# Altium PCB CORE-328PB.PcbDoc
Units mm, origin at the board's own origin, x right, y up, seen from the top; angles counter-clockwise.
Board outline 31.78 x 27.61 mm, 2 copper layers (Top Layer, Bottom Layer); 54 components, 46 nets, 149 pads, 24 vias.
Unrouted connection lines stored in the file: 32.
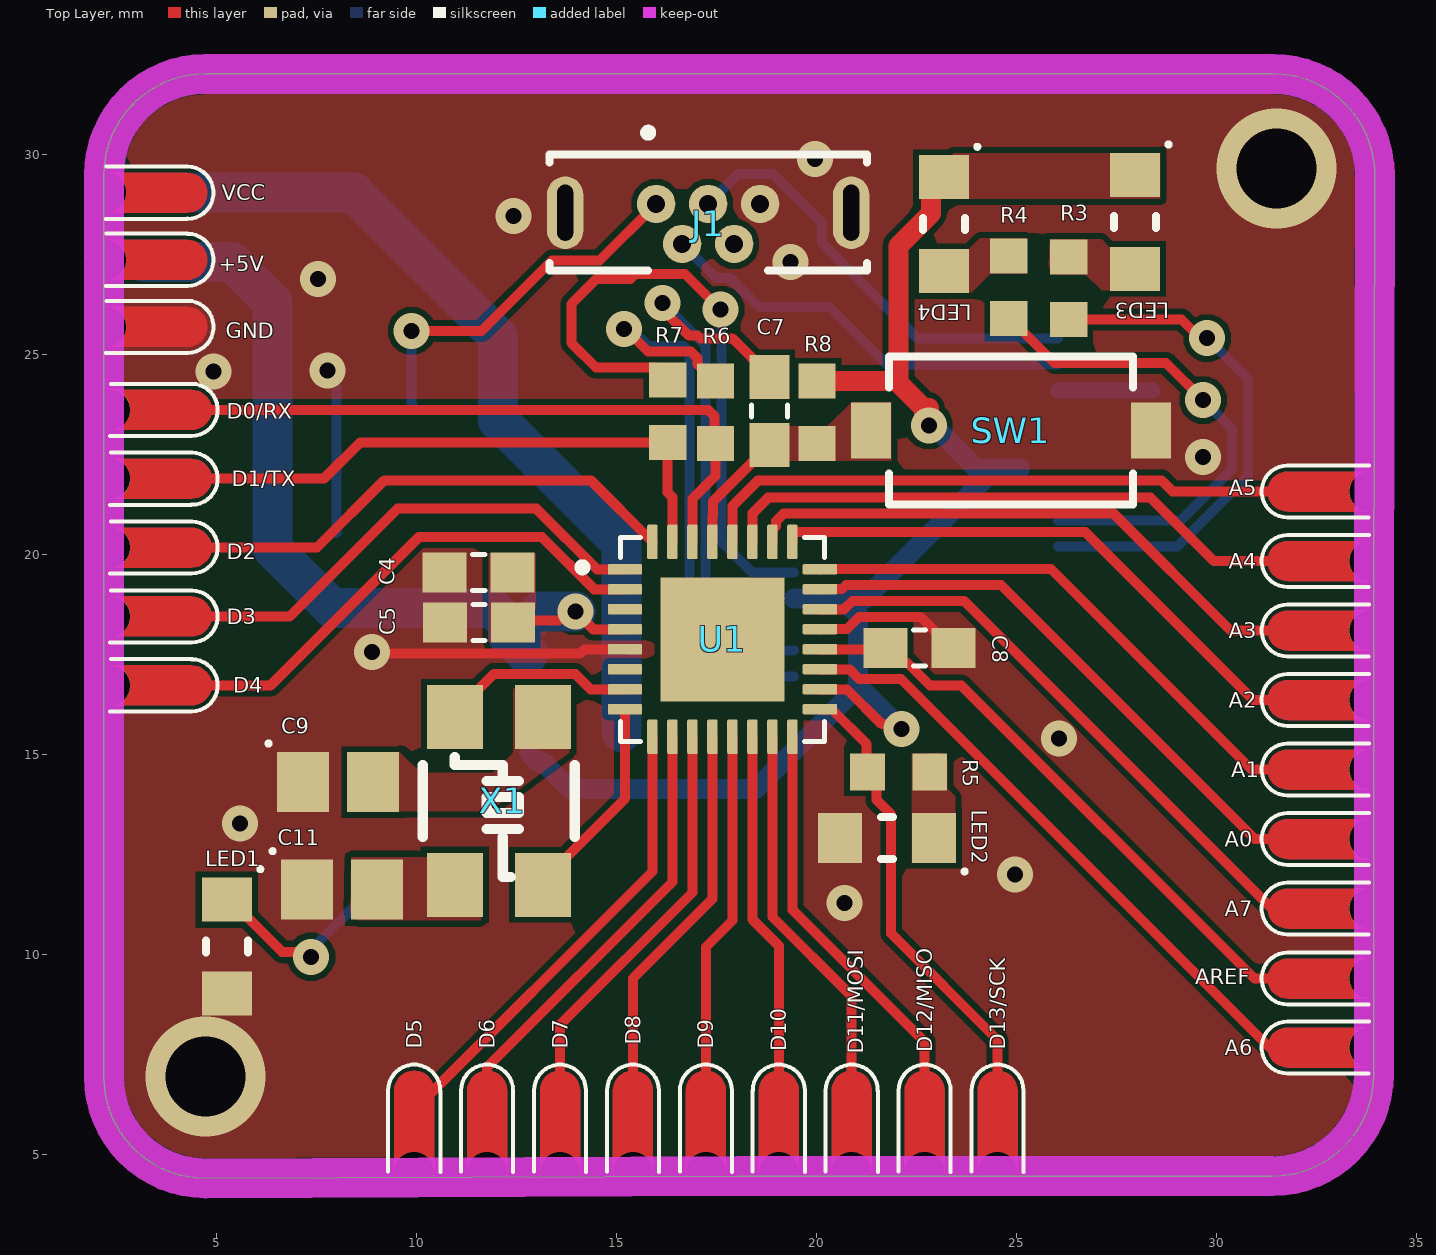
[diagram p0: Top Layer view]
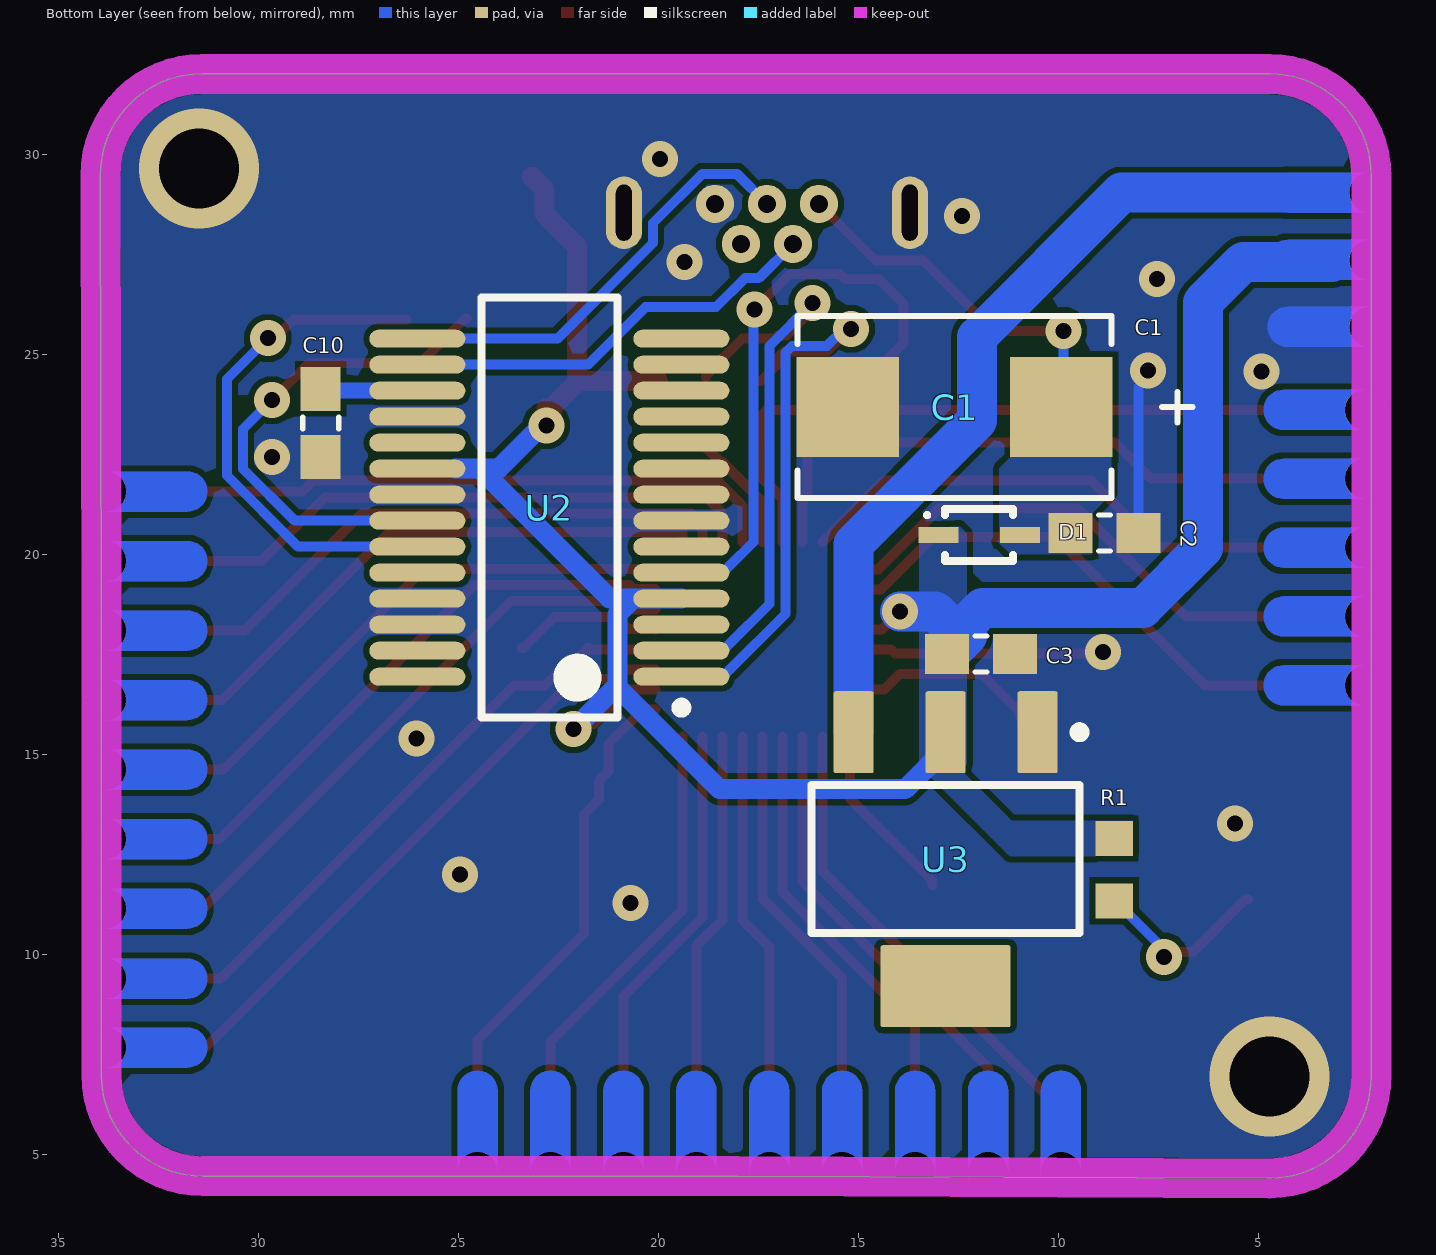
[diagram p1: Bottom Layer view, seen from below]
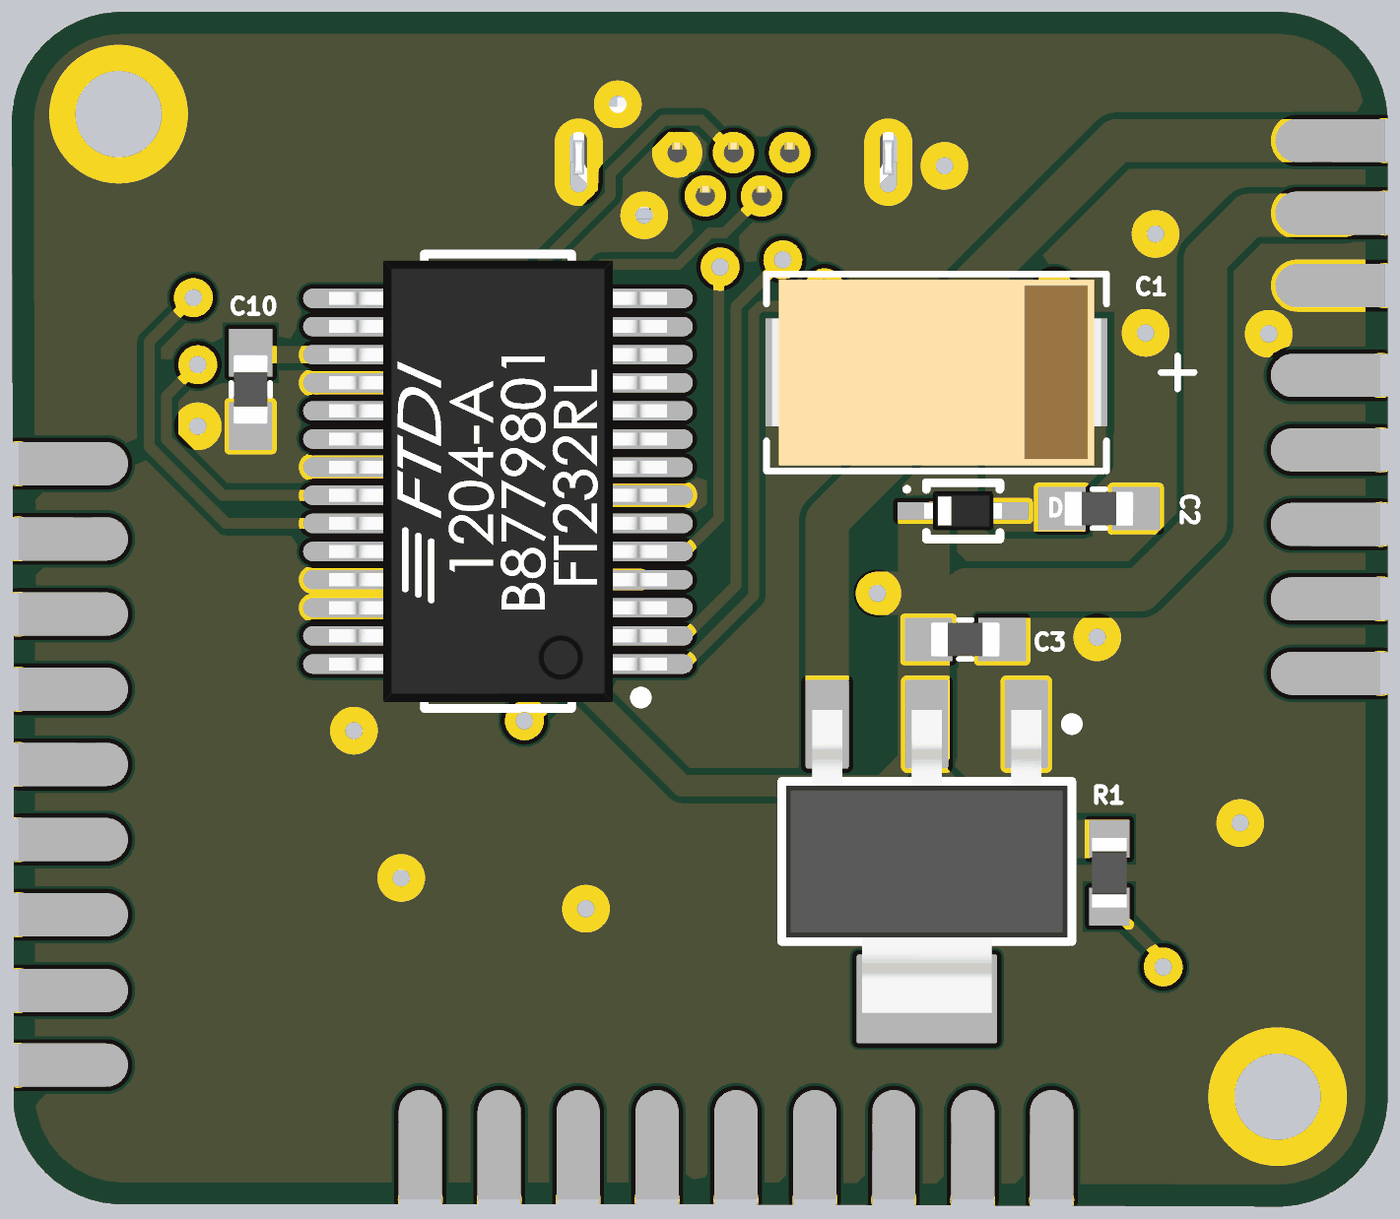
[diagram p2: 3D render of the assembled board from below, using the file's embedded part models]

## Layer stack, top to bottom
Top Solder: solder mask 0.0102, Solder Resist, Dk 3.5
Top Layer: signal copper 0.0356
Dielectric 1: dielectric 0.32, FR-4, Dk 4.8
Bottom Layer: signal copper 0.0356
Bottom Solder: solder mask 0.0102, Solder Resist, Dk 3.5

## Board outline
18.034,4.445 31.394,4.445 ccw(c31.394,6.985) 33.934,6.985 33.934,18.313 33.934,18.339 33.96,29.464 ccw(c31.42,29.464) 31.42,32.004 4.724,32.004 ccw(c4.724,29.464) 2.184,29.464 2.184,18.212 2.184,6.934 ccw(c4.724,6.934) 4.724,4.394

## Design rules (kind name [scope] priority, off if disabled: settings)
AssemblyTestPointUsage [All] p1: isadvanced=TRUE
AssemblyTestpoint [All] p1: isadvanced=TRUE testpointundercomponent=TRUE minsize=1.016 maxsize=2.54 preferedsize=1.524 minholesize=0 maxholesize=1.016 preferedholesize=0.813 testpointgrid=0.025 usegrid=TRUE gridtolerance=0 allowsidetop=TRUE allowsidebottom=TRUE
Clearance Clearance_KeepOut [IsKeepOut] p1: gap=0 ignorepadtopadclearanceinfootprint=FALSE
Clearance Clearance_1 [OnMid vs OnMid] p2: gap=0.15 ignorepadtopadclearanceinfootprint=TRUE sourcerule=44 cellrowname=All cellrowtype=0 cellcolname=All cellcoltype=0 innerlayers=TRUE
Clearance Clearance_2 [(ExistsOnLayer('Top Layer') Or ExistsOnLayer('Bottom Layer')) vs (ExistsOnLayer('Top Layer') Or ExistsOnLayer('Bottom Layer'))] p3: gap=0.15 ignorepadtopadclearanceinfootprint=TRUE sourcerule=44 cellrowname=All cellrowtype=0 cellcolname=All cellcoltype=0 outerlayers=TRUE
Clearance [All] p4: gap=0.254 ignorepadtopadclearanceinfootprint=TRUE ismatrix=TRUE
ComponentClearance [All] p1: isadvanced=TRUE gap=0.254 collisioncheckmode=3 verticalgap=0.254 showdistances=FALSE
FabricationTestPointUsage [All] p1: isadvanced=TRUE valid=0 allowmultiple=FALSE
FabricationTestpoint [All] p1: isadvanced=TRUE side=3 testpointundercomponent=TRUE minsize=1.016 maxsize=2.54 preferedsize=1.524 minholesize=0 maxholesize=1.016 preferedholesize=0.813 testpointgrid=0.025 allowsidetop=TRUE allowsidebottom=TRUE usegrid=TRUE gridtolerance=0
FanoutControl Fanout_BGA [IsBGA] p1: isadvanced=TRUE bgadir=Out bgaviamode=Centered fanoutstyle=Auto fanoutdirection=Alternating viagrid=0.025 // Fanout_BGA (Default Rule)
FanoutControl Fanout_LCC [IsLCC] p2: isadvanced=TRUE bgadir=Out bgaviamode=Centered fanoutstyle=Auto fanoutdirection=Alternating viagrid=0.025 // Fanout_LCC (Default Rule)
FanoutControl Fanout_SOIC [IsSOIC] p3: isadvanced=TRUE bgadir=Out bgaviamode=Centered fanoutstyle=Auto fanoutdirection=Alternating viagrid=0.025 // Fanout_SOIC (Default Rule)
FanoutControl Fanout_Small [(CompPinCount < 5)] p4: isadvanced=TRUE bgadir=Out bgaviamode=Centered fanoutstyle=Auto fanoutdirection=OutThenIn viagrid=0.025 // Fanout_Small (Default Rule)
FanoutControl Fanout_Default [All] p5: isadvanced=TRUE bgadir=Out bgaviamode=Centered fanoutstyle=Auto fanoutdirection=Alternating viagrid=0.025 // Fanout_Default (Default Rule)
Height [All] p1: isadvanced=TRUE minheight=0 maxheight=25.4 prefheight=12.7
HoleSize [All] p1: isadvanced=TRUE absolutevalues=TRUE maxlimit=2.54 minlimit=0.025 maxpercent=80.000 minpercent=20.000
HoleToHoleClearance [All] p1: isadvanced=TRUE gap=0.254 allowstackedmicrovias=TRUE
LayerPairs [All] p1: isadvanced=TRUE enforce=TRUE
MinimumSolderMaskSliver [All] p1: isadvanced=TRUE minsoldermaskwidth=0
NetAntennae [All] p1: isadvanced=TRUE netantennaetolerance=0
PasteMaskExpansion [All] p1: isadvanced=TRUE expansion=0
PlaneClearance [All] p1: isadvanced=TRUE clearance=0.508
PlaneConnect [All] p1: isadvanced=TRUE planeconnectstyle=Relief reliefexpansion=0.508 reliefentries=4 reliefconductorwidth=0.254 reliefairgap=0.254
PolygonConnect [All] p1: connectstyle=Direct reliefconductorwidth=0.254 reliefentries=4 polygonreliefangle="90 Angle" airgapwidth=0.254
RoutingCorners [All] p1: isadvanced=TRUE cornerstyle=45-Degree minsetback=2.54 maxsetback=2.54
RoutingPriority [All] p1: isadvanced=TRUE routingpriority=0
RoutingVias RoutingViaStyle_1 [All] p1: isadvanced=TRUE holewidth=0.254 width=0.254 viastyle="Through Hole" minholewidth=0.4 minwidth=0.9 maxholewidth=10 maxwidth=10
RoutingVias [All] p2 off: holewidth=0.711 width=1.27 viastyle="Through Hole" minholewidth=0.711 minwidth=1.27 maxholewidth=0.711 maxwidth=1.27
ShortCircuit [All] p1: isadvanced=TRUE allowed=FALSE
SilkToSilkClearance [All] p1: isadvanced=TRUE silktosilkclearance=0
SilkToSolderMaskClearance [IsPad] p1: isadvanced=TRUE minsilkscreentomaskgap=0 clearancetoexposedcopper=TRUE
SolderMaskExpansion [All] p1: isadvanced=TRUE expansion=0.102 istentingtop=FALSE
SupplyNets "Schematic Supply Nets_4" [InNet('GND')] p1: isadvanced=TRUE voltage=0.000
SupplyNets "Schematic Supply Nets_3" [InNet('3V3')] p2: isadvanced=TRUE voltage=0.000
SupplyNets "Schematic Supply Nets_2" [InNet('VUSB')] p3: isadvanced=TRUE voltage=0.000
SupplyNets "Schematic Supply Nets_1" [InNet('VCC')] p4: isadvanced=TRUE voltage=0.000
SupplyNets "Schematic Supply Nets" [InNet('+5')] p5: isadvanced=TRUE voltage=0.000
UnRoutedNet [All] p1: isadvanced=TRUE
UnpouredPolygon [All] p1: isadvanced=TRUE
Width MaxMinWidth_1 [All] p1: isadvanced=TRUE maxlimit=5 minlimit=0.25 preferedwidth=0.3 minimp=50.000000 maximp=50.000000 favimp=50.000000
Width [All] p2 off: maxlimit=0.254 minlimit=0.254 preferedwidth=0.254
4 further rules are at their usual default settings.

## Components (designator, comment, footprint, x,y, rotation, side; value= is the part's Value field where it differs from the comment)
+5V "Castellated Pad" PCBComponent_1 2.235,27.356 r270 top
A0 "Castellated Pad" PCBComponent_1 33.82,12.875 r90 top
A1 "Castellated Pad" PCBComponent_1 33.82,14.613 r90 top
A2 "Castellated Pad" PCBComponent_1 33.82,16.35 r90 top
A3 "Castellated Pad" PCBComponent_1 33.82,18.088 r90 top
A4 "Castellated Pad" PCBComponent_1 33.82,19.825 r90 top
A5 "Castellated Pad" PCBComponent_1 33.82,21.563 r90 top
A6 "Castellated Pad" PCBComponent_1 33.82,7.663 r90 top
A7 "Castellated Pad" PCBComponent_1 33.82,11.138 r90 top
AREF "Castellated Pad" PCBComponent_1 33.82,9.386 r90 top
C1 "4.7 uF" CAPMP7.6X4.3_3.1N_KEM 12.604,23.673 r0 bottom
C2 "1uF" CAPC1608X90 8.853,20.523 r180 bottom
C3 "1uF" CAPC1608X90 11.938,17.501 r180 bottom
C4 "1uF" CAPC1608X90 11.557,19.54 r180 top
C5 "1uF" CAPC1608X90 11.563,18.288 r180 top
C7 "100nF" CAPC1608X90 18.821,23.571 r90 top
C8 "100nF" CAPC1608X90 22.581,17.653 r180 top
C9 "C0805C180J5GACTU" CAPCP2012X09N 8.04,14.3 r0 top
C10 "100nF" CAPC1608X90 28.448,23.28 r270 bottom
C11 "C0805C180J5GACTU" CAPCP2012X09N 8.142,11.608 r0 top
D0/RX "Castellated Pad" PCBComponent_1 2.34,23.604 r270 top
D1 "Schottky Diode," DIOM1712X07N 11.989,20.472 r180 bottom
D1/TX "Castellated Pad" PCBComponent_1 2.34,21.882 r270 top
D2 "Castellated Pad" PCBComponent_1 2.34,20.161 r270 top
D3 "Castellated Pad" PCBComponent_1 2.34,18.44 r270 top
D4 "Castellated Pad" PCBComponent_1 2.34,16.718 r270 top
D5 "Castellated Pad" PCBComponent_1 9.943,4.545 r0 top
D6 "Castellated Pad" PCBComponent_1 11.766,4.545 r0 top
D7 "Castellated Pad" PCBComponent_1 13.589,4.545 r0 top
D8 "Castellated Pad" PCBComponent_1 15.412,4.545 r0 top
D9 "Castellated Pad" PCBComponent_1 17.235,4.545 r0 top
D10 "Castellated Pad" PCBComponent_1 19.058,4.545 r0 top
D11/MOSI "Castellated Pad" PCBComponent_1 20.881,4.545 r0 top
D12/MISO "Castellated Pad" PCBComponent_1 22.705,4.545 r0 top
D13/SCK "Castellated Pad" PCBComponent_1 24.528,4.545 r0 top
GND "Castellated Pad" PCBComponent_1 2.235,25.679 r270 top
J1 "USB3131-30-0230-A_REVB" GCT_USB3131-30-0230-A_REVB 17.293,28.533 r0 top
LED1 "Green LED" LED1913X12NGREEN 5.258,10.185 r270 top
LED2 "Kingbright Orange LED, 200 mcd 120 ° 0805" LED1913X12NYEL/ORANGE 21.768,12.903 r180 top
LED3 "Kingbright Red LED, 100 mcd 120 ° 0805" LED1913X12NRED 27.965,28.302 r270 top
LED4 "Kingbright Green LED, 70 mcd 120 ° 0805" LED1913X12NGREEN 23.184,28.245 r270 top
R1 "1K" RESC1608X55N 8.611,12.108 r270 bottom
R3 "1k" RESC1608X55N 26.309,26.645 r90 top
R4 "1k" RESC1608X55N 24.809,26.67 r90 top
R5 "1k" RESC1608X55N 22.052,14.554 r180 top
R6 "1k" RESC1608X55N 17.475,23.546 r90 top
R7 "1k" RESC1608X55N 16.281,23.571 r90 top
R8 "1k" RESC1608X55N 20.015,23.546 r270 top
SW1 "PTS635SK25SM" FP-PTS635SK25SM-MFG 24.861,23.089 r180 top
U1 "ATMEGA328PB-MUR" QFN50P500X500X90-33N 17.65,17.868 r0 top
U2 "USB" SOP65P780X200-28N 22.733,21.158 r0 bottom
U3 "LM1117IMPX-5.0" DCY0004A_M 12.827,12.37 r270 bottom
VCC "Castellated Pad" PCBComponent_1 2.235,29.032 r270 top
X1 "Aker 16MHz Crystal SMT" "Aker S5C Crystal" 10.957,15.926 r90 top value=16MHz

## Footprints (in the part's own frame and the unit in brackets; to place one, negate y for a bottom-side part, rotate by r counter-clockwise, add the part's x,y. Pads: shape width x height; smd on the part's side, far side on the other; paste and mask are expansions set on the pad)
"Aker S5C Crystal" [mm]
  rect 1.6x1.4 smd: 1(0,0) 2(-4.2,0) 3(0,-2.2) 4(-4.2,-2.2)
  round 0.254 on Top Overlay: 5(-3,-2.4)
  silkscreen extent -4,-3 -1,0.8, body extent -4.7,-2.8 0.5,0.6, height 1
CAPC1608X90 [mm]
  rect 1.1x1 smd: 1(-0.85,0) 2(0.85,0)
  silkscreen extent -0.15,-0.45 0.15,0.45, body extent -0.8,-0.4 0.8,0.4, height 0.9
CAPCP2012X09N [mm] "Chip Capacitor, 2-Leads, Body 2.00x1.25mm, IPC Medium Density"
  rect 1.3x1.5 smd: 1(-0.875,0) 2(0.875,0)
  silkscreen extent -1.79,0.91 -1.69,1.01, body extent -1.05,-0.57 0.95,0.68, height 0.78
CAPMP7.6X4.3_3.1N_KEM [mm]
  rect 2.56x2.5 smd paste+0 mask+0: 1(-2.672,0) 2(2.672,0)
  silkscreen extent -5.95,-2.28 3.93,2.28, body extent -3.8,-2.15 3.8,2.15, height 3.15
DCY0004A_M [mm] "SOT223, 4-Leads, Body 6.7x3.7mm, Pitch 2.3mm, IPC Low Density"
  rrect10% 2.05x1 smd: 1(-3.175,2.3) 2(-3.175,0) 3(-3.175,-2.3)
  rrect5% 2.05x3.25 smd: 4(3.175,0)
  silkscreen extent -3.3,-3.35 1.85,3.47, body extent -3.5,-3.25 3.5,3.25, height 1.62
DIOM1712X07N [mm] "Molded Diode, 2-Leads, Body 1.70x1.25mm, IPC Medium Density"
  rect 1x0.4 smd: 1(-1.016,0) 2(1.016,0)
  silkscreen extent -1.35,-0.65 0.85,0.65, body extent -0.9,-0.45 0.9,0.45, height 0.8
FP-PTS635SK25SM-MFG [mm]
  rect 1x1.4 smd paste+0 mask+0: 1(-3.5,0) 2(3.5,0)
  silkscreen extent -3.05,-1.85 3.05,1.85, body extent -4.1,-1.95 4.1,1.95, height 0.25
GCT_USB3131-30-0230-A_REVB [mm]
  round 0.958 hole 0.45: 1(-1.3,0.22) 2(-0.65,-0.78) 3(0,0.22) 4(0.65,-0.78) 5(1.3,0.22)
  oval 0.908x1.816 hole 0.4 slot 1.4 at 90 deg: S1(-3.575,0) S2(3.575,0)
  silkscreen extent -3.97,-1.45 3.97,2.1, body extent -3.97,-1.32 3.97,1.52, height 5.59
LED1913X12NGREEN [mm] "LED 2-Leads, Body 1.90x1.32mm, IPC Medium Density"
  rect 1.1x1.25 smd: 1(-1.175,0) 2(1.175,0)
  silkscreen extent -1.99,-0.53 0.15,0.89, body extent -1.01,-0.62 1.01,0.63, height 1.1
LED1913X12NRED [mm] "LED 2-Leads, Body 1.90x1.32mm, IPC Medium Density"
  rect 1.1x1.25 smd: 1(-1.175,0) 2(1.175,0)
  silkscreen extent -1.99,-0.53 0.15,0.89, body extent -1.02,-0.43 1.04,0.47, height 0.85
LED1913X12NYEL/ORANGE [mm] "LED 2-Leads, Body 1.90x1.32mm, IPC Medium Density"
  rect 1.1x1.25 smd: 1(-1.175,0) 2(1.175,0)
  silkscreen extent -1.99,-0.53 0.15,0.89, body extent -1.01,-0.62 1.01,0.63, height 1.1
PCBComponent_1 [mm]
  round 1 hole 1: 0(0,0)
  Multi-Layer region: -0.5,0.016 0.475,0.016 0.5,-0.009 0.5,2.04 0.451,2.257 0.312,2.431 0.111,2.528 -0.111,2.528 -0.312,2.431 -0.45,2.257 -0.5,2.04 -0.5,2.04
  silkscreen extent -0.65,0 0.65,2.69
QFN50P500X500X90-33N [mm]
  rrect25% 0.86x0.26 smd: 1(-2.435,1.75) 2(-2.435,1.25) 3(-2.435,0.75) 4(-2.435,0.25) 5(-2.435,-0.25) 6(-2.435,-0.75) 7(-2.435,-1.25) 8(-2.435,-1.75) 17(2.435,-1.75) 18(2.435,-1.25) 19(2.435,-0.75) 20(2.435,-0.25) 21(2.435,0.25) 22(2.435,0.75) 23(2.435,1.25) 24(2.435,1.75)
  rrect25% 0.26x0.86 smd: 9(-1.75,-2.435) 10(-1.25,-2.435) 11(-0.75,-2.435) 12(-0.25,-2.435) 13(0.25,-2.435) 14(0.75,-2.435) 15(1.25,-2.435) 16(1.75,-2.435) 25(1.75,2.435) 26(1.25,2.435) 27(0.75,2.435) 28(0.25,2.435) 29(-0.25,2.435) 30(-0.75,2.435) 31(-1.25,2.435) 32(-1.75,2.435)
  rect 3.1x3.1 smd paste-0.57: 33(0,0)
  silkscreen extent -3.6,-2.55 2.55,2.55, body extent -2.5,-2.5 2.5,2.5, height 0.85
RESC1608X55N [mm]
  rect 0.87x0.93 smd: 1(-0.78,0) 2(0.78,0)
  body extent -0.8,-0.4 0.8,0.4, height 0.55
SOP65P780X200-28N [mm] "SOP, 28-Leads, Body 10.20x5.30mm, Pitch 0.65mm, IPC Medium Density"
  oval 2.4x0.45 smd: 1(-3.3,4.225) 2(-3.3,3.575) 3(-3.3,2.925) 4(-3.3,2.275) 5(-3.3,1.625) 6(-3.3,0.975) 7(-3.3,0.325) 8(-3.3,-0.325) 9(-3.3,-0.975) 10(-3.3,-1.625) 11(-3.3,-2.275) 12(-3.3,-2.925) 13(-3.3,-3.575) 14(-3.3,-4.225) 15(3.3,-4.225) 16(3.3,-3.575) 17(3.3,-2.925) 18(3.3,-2.275) 19(3.3,-1.625) 20(3.3,-0.975) 21(3.3,-0.325) 22(3.3,0.325) 23(3.3,0.975) 24(3.3,1.625) 25(3.3,2.275) 26(3.3,2.925) 27(3.3,3.575) 28(3.3,4.225)
  silkscreen extent -3.42,-5.25 1.7,5.25, body extent -3.91,-5.1 3.91,5.1, height 2

## Part data
+5V A0 A1 A2 A3 A4 A5 A6 A7 AREF D0/RX D1/TX D2 D3 D4 D5 D6 D7 D8 D9 D10 D11/MOSI D12/MISO D13/SCK GND VCC: "Custom_Castellated_Module"
C1: library part T521D475M063ATE075, "T521, Tantalum, Polymer Tantalum, Commercial Grade, 4.7 uF, 20%, 63 VDC, SMD, Polymer, Molded, Low ESR, Non-Combustible, 75 mOhms, 7343, Height Max = 3.1mm", Manufacturer_Name=Kemet, Copyright="Copyright (C) 2026 Ultra Librarian. All rights reserved.", Datasheet=https://content.kemet.com/datasheets/KEM_T2076_T52X-530.pdf, Manufacturer_Part_Number=T521D475M063ATE075
C2 C3 C4 C5 C7 C8 C10: library part CC0603MRX5R8BB105, "1 ÂµF Â±20% 25V Ceramic Capacitor X5R 0603 (1608 Metric)", Package="0603 Yageo", Check_prices=https://www.snapeda.com/parts/CC0603MRX5R8BB105/Yageo/view-part/?ref=eda, MF=Yageo, MP=CC0603MRX5R8BB105, SnapEDA_Link=https://www.snapeda.com/parts/CC0603MRX5R8BB105/Yageo/view-part/?ref=snap
C9 C11: library part "18pF Ceramic Multilayer Capacitor, 50 V dc C0G Dielectric ±5% SMD", "18pF Ceramic Multilayer Capacitor, 50 V dc C0G Dielectric ±5% SMD", Capacitance=18pF, Manufacturer=Kemet, Package=0805, Voltage=50V, Creator="Ritesh Kanjee", Datasheet URL=http://za.rs-online.com/web/p/ceramic-multilayer-capacitors/6480935/?searchTerm=C0805C180J5GACTU&relevancy-data=636F3D3226696E3D4931384E4B6E6F776E41734D504E266C753D656E266D6D3D6D61746368616C6C7061727469616C26706D3D5E5B5C707B4C7D5C707B4E647D2D2C2F255C2E5D2B2426706F3D313326736E3D592673743D4D414E5F504152545F4E554D4245522677633D424F5448267573743D4330383035433138304A35474143545526, Date Created="18 February 2015", RS Stock No.=648-0935
D1: library part "Schottky Diode, 0.5A, 20V, 2.4ns, 2-Pin SMini2 F5 B", "Panasonic DB2J20900L Schottky Diode, 0.5A, 20V, 2.4ns, 2-Pin SMini2 F5 B", Manufacturer=Panasonic, Manufacturer Part No.=DB2J20900L, Maximum Continuous Forward Current=0.5A, Peak Reverse Repetitive Voltage=20V, Created By="R Kanjee", Datasheet=http://docs-europe.electrocomponents.com/webdocs/1398/0900766b813986b3.pdf, Date Created="1 March 2015", RS Stock No.=713-2703
J1: "USB - micro B USB 2.0 Receptacle Connector 5 Position Through Hole", Package=None, Availability=Unavailable, MP=USB3131-30-0230-A_REVB, Price=None
LED1: library part "Kingbright Green LED, 70 mcd 120 ° 0805", "Kingbright Green LED, 70 mcd 120 ° 0805", Color=Green, Forward Voltage="2.1 V", Manufacturer=KingBright, Manufacturer Part No.=KP-2012MGC, Creator="Ritesh Kanjee", Datasheet URL=http://za.rs-online.com/web/p/visible-leds/4663778/, Date Created="18 February 2015", RS Stock No.=466-3778
LED2: Color=Orange, Forward Voltage=1.85V, Manufacturer=KingBright, Manufacturer Part No.=KP-2012SEC, Creator="Ritesh Kanjee", Datasheet URL=http://za.rs-online.com/web/p/visible-leds/4663790/, Date Created="18 February 2015", RS Stock No.=466-3790
LED3: Color=RED, Forward Voltage=1.85V, Manufacturer=KingBright, Manufacturer Part No.=KP-2012SRC-PRV, Creator="Ritesh Kanjee", Datasheet URL=http://za.rs-online.com/web/p/visible-leds/4663813/, Date Created="18 February 2015", RS Stock No.=466-3813
LED4: Color=Green, Forward Voltage="2.1 V", Manufacturer=KingBright, Manufacturer Part No.=KP-2012MGC, Creator="Ritesh Kanjee", Datasheet URL=http://za.rs-online.com/web/p/visible-leds/4663778/, Date Created="18 February 2015", RS Stock No.=466-3778
R1 R3 R4 R5 R6 R7 R8: library part CR0603AFX-1001EAS, "DirenÃ§, AS 0603 1k %1 100mW TC100", Package="0603-2 Bourns", Check_prices=https://www.snapeda.com/parts/CR0603AFX-1001EAS/Bourns/view-part/?ref=eda, MF=Bourns, MP=CR0603AFX-1001EAS, SnapEDA_Link=https://www.snapeda.com/parts/CR0603AFX-1001EAS/Bourns/view-part/?ref=snap
SW1: library part CMP-10040-000010-1, "SWITCH TACTILE SPST-NO 0.05A 12V", Contact Current Rating=50mA, Contact Resistance=100mΩ, Manufacturer="C&K Components", Operating Force=260gf, Temperature="-10°C to +60°C", Temperature Range High=+60°C, Temperature Range Low=-10°C, Voltage Rating Dc=12V, Automotive=No, Category=Switch, ComponentLink2Description=Datasheet, ComponentLink2URL=https://media.digikey.com/pdf/Data%20Sheets/C&K/PTS635%20with%2025%20code%20actuator.pdf, Device Class L1=Electromechanical, Device Class L2=Switches, Device Class L3="Tactile Switches", Digikey Description="SWITCH TACTILE SPST-NO 0.05A 12V", Electromechanical Life=20000Cycles, Height=2.5mm, Lead Free=Yes, Manufacturer Part Number=PTS635SK25SM, Mount="Surface Mount", Octopart=https://octopart.com/pts635sk25sm-c%26k+components-8206497, Package=PTS635SK25SM, RoHS=TRUE, Throw Configuration=SPST
U1: "AVR series Microcontroller IC 8-Bit 20MHz 32KB (16K x 16) FLASH 32-VFQFN (5x5)", Package="VFQFN-32 Microchip Technology", Availability="In Stock", Check_prices=https://www.snapeda.com/parts/ATMEGA328PB-MUR/Microchip/view-part/?ref=eda, MF="Microchip Technology", MP=ATMEGA328PB-MUR, Price=None, Purchase-URL=https://pricing.snapeda.com/search/part/ATMEGA328PB-MUR/?ref=eda, SnapEDA_Link=https://www.snapeda.com/parts/ATMEGA328PB-MUR/Microchip/view-part/?ref=snap
U2: library part "FT232RL USB to UART, Universal Asynchronous Receiver & Transmitter 3MBd, 28-Pin, SSOP", "FT232RL, Universal Asynchronous Receiver & Transmitter 3MBd, 28-Pin, SSOP", Manufacturer="FTDI Chip", Manufacturer Part No.=FT232RL, Creator="R Kanjee", Date Created="03 March 2015", Pin Count=28, RS Stock No.=406-580
U3: library part CMP-0062-01626-4, "800mA Low-Dropout Linear Regulator, 4-pin SOT-223", Manufacturer="Texas Instruments", PackageTopMarking=XYTT*N06B, PowerWise=N, Code_IPC=SOT223-4, Code_JEDEC=TO-261-AA, ComponentLink1Description="Datasheet URL", ComponentLink1URL=http://www.ti.com/general/docs/lit/getliterature.tsp?genericPartNumber=LM1117-N&fileType=pdf, CompType="LDO IC", High-Reliability=Y, PackageDescription="Molded SOT-223, 6.50 x 3.56 x 1.6mm Body, 4 Lead, 2.3mm Pitch", PackageReference=DCY0004A, PartNumber=LM1117IMPX-5.0, PinCount=4, RoHS=N
X1: library part "Aker  C5S-16.000-12-3030-X", "Aker S5C SMT Crystal", Frequency Stability=+/-30ppm, Load Capacitance=12pF, Manufacturer=Aker, Manufacturer Part #=C5S-16.000-12-3030-X, Package="3.2x5mm SMD", Creator="R Kanjee", HelpURL=http://za.rs-online.com/web/p/crystal-units/6719488/, RS="RS 671-9488", RS Stock Nr.=671-9488, Supplier=RS

## Via types
v1: diameter 0.9, hole 0.4, Top Layer to Bottom Layer, 22 vias
v2: diameter 3, hole 2, Top Layer to Bottom Layer, 2 vias

## Nets (pads, with @x,y where several pads share a name; then routed paths per layer and width w, separated by ;. In a path a pad name is that pad's centre, name@x,y a point inside that pad or via, vN(x,y) a via of type N, cw(c..) or ccw(c..) an arc to the next point about the centre after c; other vN are vias at no path point)
3V3: C10.1 U2.17 | length 2.4
  Bottom Layer w0.25: C10.1@28.401,24.083 C10.1
  Bottom Layer w0.4: U2.17 C10.1@28.401,24.083
+5: +5V.0 C3.1 C4.1 C5.1 D1.1 LED3.1 LED4.1 R1.1 R8.1 U1.4 U1.18 U2.4 U2.20 U3.2 | length 56.8
  Top Layer w0.25: C5.1 12.466,18.341 13.568,18.341 13.794,18.567 v1(13.97,18.567) 14.419,18.118 U1.4 ; U1.18 20.09,16.613 20.766,16.613 21.634,15.745 21.999,15.745 v1(22.123,15.621)
  Top Layer w0.5: R8.1 22.004,24.326 22.047,24.282 ; v1@22.809,23.645 v1(22.809,23.216) 22.685,23.34 22.685,23.645 22.047,24.282 ; LED4.1 23.159,29.42 22.859,29.12 22.859,28.509 22.047,27.697 22.047,24.282
  Bottom Layer w0.5: U3.2 12.827,15.02 13.077,14.77 13.187,14.77 13.837,14.12 18.478,14.12 21.033,16.674 21.033,16.711 ; U2.4 U2.4@20.462,18.883 ; U2.4@20.462,18.894 21.227,18.894 24.477,22.144 ; 20.667,18.858 21.033,18.492 21.033,16.711 ; v1@22.113,15.632 21.033,16.711 ; v1(22.809,23.216) 22.917,23.216 23.117,23.016 23.12,23.016 23.991,22.144 24.477,22.144 ; U2.20@25.083,22.144 24.477,22.144
  Bottom Layer w1: 3.184,27.305 5.385,27.305 6.396,26.294 6.396,20.147 7.892,18.651 11.906,18.651 12.288,18.27 12.288,17.951 12.738,17.501 C3.1 ; 12.86,18.341 13.086,18.567 v1(13.97,18.567)
A0: A0.0 U1.23 | length 16.4
  Top Layer w0.25: U1.23 20.09,19.123 20.631,19.123 20.735,19.228 24.612,19.228 30.965,12.875 A0.0
A1: A1.0 U1.24 | length 15.8
  Top Layer w0.25: U1.24 20.09,19.623 20.565,19.623 20.57,19.628 25.863,19.628 30.879,14.613 A1.0
A2: A2.0 U1.25 | length 16.4
  Top Layer w0.25: U1.25 19.4,20.544 19.405,20.549 26.721,20.549 30.919,16.35 A2.0
A3: A3.0 U1.26 | length 16.7
  Top Layer w0.25: U1.26 18.905,20.308 18.905,20.608 18.995,20.698 18.995,20.828 19.175,21.008 27.43,21.008 30.35,18.088 A3.0
A4: A4.0 U1.27 | length 17
  Top Layer w0.25: U1.27 18.405,20.308 18.405,21.021 18.792,21.408 28.35,21.408 29.933,19.825 A4.0
A5: A5.0 U1.28 | length 17.2
  Top Layer w0.25: U1.28 17.905,20.308 17.905,21.207 18.542,21.844 28.626,21.844 28.907,21.563 A5.0
A6: A6.0 U1.19 | length 17.7
  Top Layer w0.25: U1.19 20.827,17.118 21.067,16.878 22.111,16.878 31.326,7.663 A6.0
A7: A7.0 U1.22 | length 17
  Top Layer w0.25: U1.22 20.691,18.618 20.901,18.828 23.694,18.828 31.385,11.138 A7.0
AREF: AREF.0 C8.2 U1.20 | length 17.2
  Top Layer w0.25: U1.20 21.696,17.618 C8.2 21.781,17.653 22.156,17.278 22.277,17.278 22.841,16.713 23.622,16.713 30.949,9.386 AREF.0
D0/RX: D0/RX.0 R6.1 U1.30 | length 19.1
  Top Layer w0.25: D0/RX.0@2.34,23.597 17.299,23.597 17.445,23.45 17.445,22.796 R6.1 17.475,21.956 16.9,21.38 U1.30 ; D0/RX.0 2.484,23.747 2.86,23.747 2.862,23.749
D1/TX: D1/TX.0 R7.1 U1.31 | length 16.9
  Top Layer w0.25: D1/TX.0 7.684,21.882 8.593,22.791 R7.1 16.281,21.539 16.4,21.421 U1.31
D2: D2.0 U1.32 | length 14.9
  Top Layer w0.25: D2.0 7.512,20.161 9.195,21.844 14.359,21.844 U1.32
D3: D3.0 U1.1 | length 14.6
  Top Layer w0.25: D3.0 6.832,18.44 9.525,21.133 12.996,21.133 14.51,19.618 U1.1
D4: D4.0 U1.2 | length 14.9
  Top Layer w0.25: D4.0 6.356,16.718 10.059,20.422 13.141,20.422 14.445,19.118 U1.2
D5: D5.0 U1.9 | length 13.4
  Top Layer w0.25: D5.0 9.943,6.108 15.9,12.064 U1.9
D6: D6.0 U1.10 | length 12.8
  Top Layer w0.25: D6.0 11.766,7.169 16.4,11.802 U1.10
D7: D7.0 U1.11 | length 12.3
  Top Layer w0.25: D7.0 13.589,8.23 16.9,11.54 U1.11
D8: D8.0 U1.12 | length 11.7
  Top Layer w0.25: D8.0 15.412,9.392 17.4,11.38 U1.12
D9: D9.0 U1.13 | length 11.2
  Top Layer w0.25: D9.0 17.235,10.174 17.9,10.838 U1.13
D10: D10.0 U1.14 | length 11.2
  Top Layer w0.25: U1.14 18.405,15.428 18.405,10.858 19.058,10.205 D10.0
D11/MOSI: D11/MOSI.0 U1.15 | length 11.7
  Top Layer w0.25: U1.15 18.9,10.929 20.881,8.947 D11/MOSI.0
D12/MISO: D12/MISO.0 U1.16 | length 12.3
  Top Layer w0.25: U1.16 19.4,11.106 22.705,7.801 D12/MISO.0
D13/SCK: D13/SCK.0 R5.2 U1.17 | length 13.6
  Top Layer w0.25: U1.17 20.09,16.113 20.39,16.113 21.255,15.248 21.255,14.572 21.496,14.331 21.496,13.861 21.869,13.487 21.869,10.512 24.528,7.854 D13/SCK.0
GND: C1.2 C2.2 C3.2 C4.2 C5.2 C8.1 C9.1 C10.2 C11.1 GND.0 J1.5 J1.S1 J1.S2 LED1.2 LED2.2 SW1.1 U1.5 U1.21 U2.7 U2.18 U2.21 U2.25 U2.26 U3.1 | length 14.3
  Top Layer w0.25: v1(8.89,17.551) 8.928,17.513 14.093,17.513 14.199,17.618 U1.5 ; U1.21 20.09,18.123 20.762,18.123 21.067,18.428 22.606,18.428 23.381,17.653 C8.1
  Bottom Layer w0.25: v1(7.772,24.587) 7.772,24.411 8.003,24.181 C2.2
  other v1: 20.701,11.278 24.968,11.989 5.588,13.259 26.06,15.392 29.667,22.428 4.93,24.566 7.544,26.873 19.355,27.305 12.421,28.448 19.964,29.87
  other v2: 4.724,6.934 31.496,29.642
NetC7_2: C7.2 U2.2 | length 14.2
  Top Layer w0.25: v1(16.154,26.276) 16.154,26.116 16.81,25.461 17.026,25.461 17.101,25.386 17.906,25.386 18.821,24.471 C7.2
  Bottom Layer w0.25: v1(16.154,26.276) 16.158,26.276 17.231,25.202 17.231,18.753 18.251,17.733 18.254,17.733 18.404,17.583 U2.2
NetC9_2: C9.2 X1.3
NetC11_2: C11.2 X1.2
NetJ1_2: J1.2 U2.16 | length 10.6
  Bottom Layer w0.25: J1.2 17.499,26.896 17.842,26.896 18.563,26.175 20.323,26.175 21.765,24.733 U2.16
NetJ1_3: J1.3 U2.15 | length 11.1
  Bottom Layer w0.25: J1.3 18.047,29.507 18.905,29.507 20.139,28.273 20.139,27.777 22.532,25.383 U2.15
NetLED1_1: LED1.1 R1.2 | length 4.6
  Top Layer w0.25: LED1.1 5.333,11.36 6.637,10.056 7.242,10.056 v1(7.366,9.931)
  Bottom Layer w0.25: v1(7.366,9.931) 7.49,10.056 7.49,10.238 8.581,11.328 R1.2
NetLED2_1: LED2.1 R5.1
NetLED3_2: LED3.2 R3.2
NetLED4_2: LED4.2 R4.2
NetR3_1: R3.1 U2.23 | length 13
  Top Layer w0.25: R3.1 29.128,25.865 29.593,25.4 v1(29.769,25.4)
  Bottom Layer w0.25: U2.23 29.013,20.183 30.792,21.962 30.792,24.377 v1(29.769,25.4)
NetR4_1: R4.1 U2.22 | length 12.6
  Top Layer w0.25: R4.1 24.839,25.89 25.951,24.777 28.741,24.777 v1(29.667,23.851)
  Bottom Layer w0.25: U2.22 29.097,20.833 30.392,22.128 30.392,23.126 v1(29.667,23.851)
NetU1_7: U1.7 X1.1 | length 4.9
  Top Layer w0.25: X1.1 10.957,16.026 11.932,17.001 13.971,17.001 14.354,16.618 U1.7
NetU1_8: U1.8 X1.4 | length 5.2
  Top Layer w0.25: X1.4 13.157,11.826 15.215,13.883 U1.8
RESET: C7.1 R8.2 SW1.2 U1.29 | length 3
  Top Layer w0.25: U1.29 17.405,20.308 17.405,20.967 17.408,20.971 17.408,21.308 18.396,22.296 18.446,22.296 18.821,22.671 C7.1
RX: R6.2 U2.1 | length 14.6
  Top Layer w0.25: v1(15.189,25.629) 15.221,25.629 15.789,25.061 16.86,25.061 17.021,24.9 17.021,24.75 17.445,24.326 R6.2
  Bottom Layer w0.25: v1(15.189,25.629) 15.365,25.629 15.796,25.198 16.67,25.198 16.831,25.037 16.831,18.503 18.251,17.083 18.254,17.083 18.404,16.933 U2.1
SCL1: U1.6
SDA1: U1.3
TX: R7.2 U2.5 | length 16.1
  Top Layer w0.25: R7.2 15.971,24.661 14.487,24.661 13.878,25.27 13.878,26.257 14.496,26.875 15.35,26.875 15.475,27.001 16.329,27.001 16.33,26.999 16.715,26.999 v1(17.602,26.111)
  Bottom Layer w0.25: v1(17.602,26.111) 17.631,26.082 17.631,20.303 18.251,19.683 18.254,19.683 18.404,19.533 U2.5
VCC: U3.3 VCC.0 | length 22.5
  Bottom Layer w1: VCC.0 8.433,29.032 12.04,25.425 12.04,23.343 15.127,20.255 U3.3
VUSB: C1.1 C2.1 D1.2 J1.1 | length 9.4
  Top Layer w0.25: v1(9.881,25.578) 11.629,25.578 13.389,27.338 14.578,27.338 J1.1
  Bottom Layer w0.25: v1(9.881,25.578) 9.881,23.724 C1.1
pads on no net: J1.4 U1.33 U2.3 U2.6 U2.8 U2.9 U2.10 U2.11 U2.12 U2.13 U2.14 U2.19 U2.24 U2.27 U2.28 U3.4 X1.5

## Polygon pours and split planes (outlines as drawn)
GND on Top Layer "GND_L01_P031" (solid, remove dead copper, pour order 31): 34.277,34.442 1.359,34.442 ccw(c1.359,33.045) -0.038,33.045 -0.038,2.286 ccw(c0.826,2.286) 0.826,1.422 35.751,1.422 ccw(c35.751,2.489) 36.817,2.489 36.817,34.646 cw(c36.792,34.646) 36.792,34.62 34.252,34.62
+5 on Top Layer "+5_L01_P011" (solid, pour order 11): 11.811,20.018 11.811,17.805 12.979,17.805 12.979,20.018
NetLED2_1 on Top Layer "NETLED2_1_L01_P030" (solid, pour order 30): 22.377,15.011 22.377,12.294 23.495,12.294 23.47,12.319 23.47,13.945 23.266,14.148 23.266,15.037
+5 on Top Layer "+5_L01_P029" (solid, pour order 29): 22.555,29.972 22.606,30.023 28.6,30.023 28.6,28.88 22.555,28.88
NetLED3_2 on Top Layer "NETLED3_2_L01_P020" (solid, pour order 20): 25.832,27.864 27.127,27.864 27.33,27.661 28.524,27.661 28.524,26.594 27.127,26.594 26.721,27 25.806,27
NetC9_2 on Top Layer "NETC9_2_L01_P022" (solid, pour order 22): 8.28,15.037 9.55,15.037 9.576,15.062 10.109,14.529 11.913,14.529 12.421,15.037 12.421,16.637 13.818,16.637 13.843,16.612 13.818,16.586 13.818,15.037 11.816,13.564 8.331,13.564 8.28,13.614
NetC11_2 on Top Layer "NETC11_2_L01_P021" (solid, pour order 21): 8.371,12.421 11.608,12.421 11.608,10.846 8.343,10.846
NetLED4_2 on Top Layer "NETLED4_2_L01_P019" (solid, pour order 19): 24.079,27.889 23.774,27.584 22.581,27.584 22.581,26.518 22.606,26.543 23.876,26.543 24.359,27.026 25.248,27.026 25.248,27.889
RESET on Top Layer "RESET_L01_P018" (solid, pour order 18): 18.828,23.19 20.269,23.19 20.879,23.8 21.869,23.8 21.869,22.327 18.816,22.327
GND on Bottom Layer "GND_L02_P032" (solid, remove dead copper, pour order 32): 37.196,34.783 2.729,34.783 ccw(c2.729,32.243) 0.189,32.243 0.189,1.484 ccw(c1.713,1.484) 1.713,-0.04 36.561,-0.04
+5 on Bottom Layer "+5_L02_P028" (solid, pour order 28): 13.487,20.65 13.487,14.554 12.395,14.554 12.344,14.503 12.294,14.554 12.294,20.7
VUSB on Bottom Layer "VUSB_L02_P027" (solid, pour order 27): 11.176,24.917 11.176,22.454 11.481,22.149 11.481,20.371 11.532,20.32 11.201,19.99 9.169,19.99 9.169,21.006 8.687,21.488 8.687,24.892 8.661,24.917
+5 on Bottom Layer "+5_L02_P026" (solid, pour order 26): 13.335,16.662 13.31,16.688 12.344,16.688 12.344,14.503 11.176,13.335 8.153,13.335 8.153,12.497 9.017,12.497 9.068,12.446 11.227,12.446 13.335,14.554 13.335,16.637

## Keep-outs
Keep-Out Layer:
  lines w0.5: 4.723,4.644 4.724,4.644 ; 18.035,4.195 18.034,4.195 ; 4.724,4.144 ccw(c4.724,4.394) 4.726,4.144 ; 4.724,4.144 cw(c4.724,6.934) 1.934,6.934 1.934,18.212 1.934,29.464 cw(c4.724,29.464) 4.724,32.254 31.42,32.254 ; 4.724,4.144 ccw(c4.724,4.394) 4.725,4.144 ; 4.724,4.644 ccw(c4.724,6.934) 4.724,4.644 ; 4.724,4.644 cw(c4.724,6.934) 2.434,6.934 2.434,18.212 2.434,29.464 cw(c4.724,29.464) 4.724,31.754 31.419,31.754 ; 4.724,4.644 18.032,4.695 ; 4.726,4.144 18.034,4.195 ; 4.725,4.144 4.726,4.144 ; 18.033,4.695 cw(c18.034,4.445) 18.034,4.695 ; 18.032,4.695 cw(c18.034,4.445) 18.034,4.695 ; 18.032,4.695 18.033,4.695 ; 18.034,4.195 31.394,4.195 ccw(c31.394,6.985) 34.184,6.985 34.184,18.313 34.184,18.338 ; 18.034,4.195 18.034,4.195 ; 18.034,4.695 31.394,4.695 ccw(c31.394,6.985) 33.684,6.985 33.684,18.313 33.684,18.339 ; 31.419,31.754 ccw(c31.42,32.004) 31.42,31.754 ; 31.419,31.754 31.42,31.754 ; 31.42,31.754 cw(c31.42,29.464) 33.71,29.464 ; 31.42,32.254 cw(c31.42,29.464) 31.421,32.254 ; 31.42,32.254 cw(c31.42,32.004) 31.421,32.254 ; 31.421,32.254 cw(c31.42,29.464) 34.21,29.465 ; 33.684,18.339 ccw(c33.934,18.339) 33.684,18.339 ; 33.684,18.339 ccw(c33.934,18.339) 33.684,18.339 ; 33.684,18.339 33.71,29.464 ; 33.71,29.464 ccw(c33.96,29.464) 33.71,29.464 ; 33.71,29.464 33.71,29.465 ; 34.184,18.338 34.21,29.463 ; 34.184,18.338 34.184,18.339 ; 34.21,29.464 ccw(c33.96,29.464) 34.21,29.465 ; 34.21,29.463 ccw(c33.96,29.464) 34.21,29.464 ; 34.21,29.464 ccw(c31.42,29.464) 34.21,29.465 ; 34.21,29.463 ccw(c33.96,29.464) 34.21,29.464